# Altium PCB Side_PCB_v1.0.PcbDoc
Units mil, origin at the board's own origin, x right, y up, seen from the top; angles counter-clockwise.
Board outline 1614.17 x 295.28 mil, 2 copper layers (Top Layer, Bottom Layer), stack 33.378 mil thick; 5 components, 6 nets, 22 pads, 4 vias.
Unrouted connection lines stored in the file: 4.
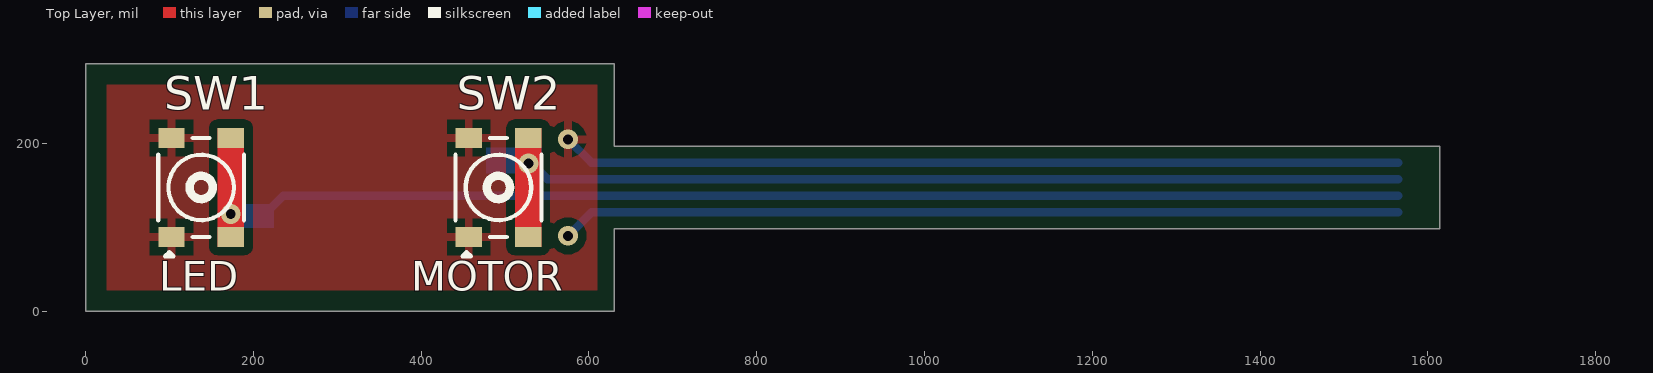
[diagram p0: Top Layer view]
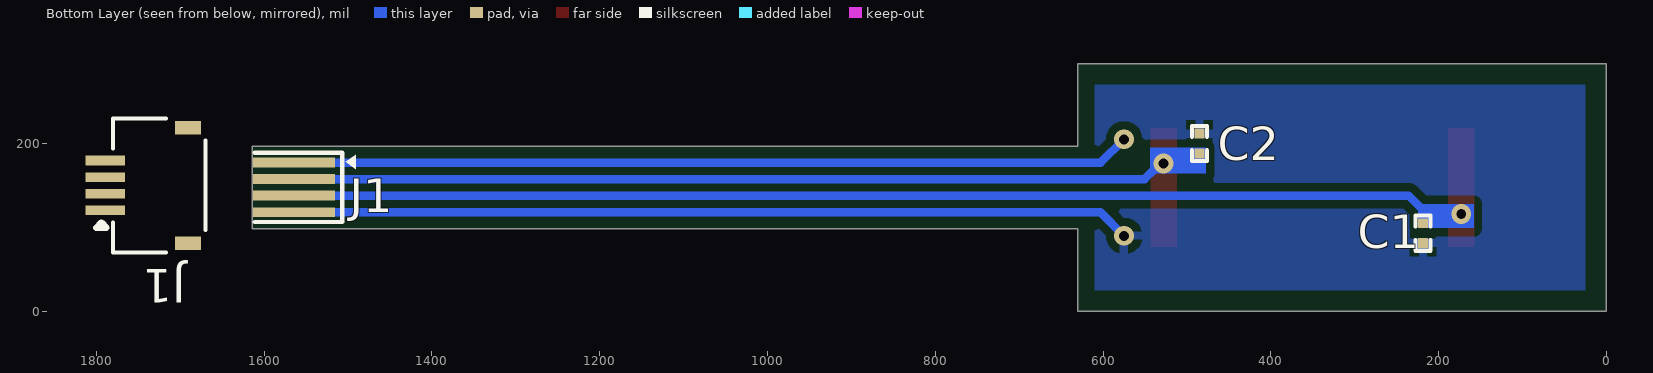
[diagram p1: Bottom Layer view, seen from below]

## Layer stack, top to bottom
Top Solder: solder mask 3, Solder Resist, Dk 3.5
Top Layer: signal copper 10
Dielectric 1: dielectric 13.378, FR-4, Dk 4.8
Bottom Layer: signal copper 10
Bottom Solder: solder mask 3, Solder Resist, Dk 3.5

## Board outline
0,0 629.92,0 629.92,98.43 1614.17,98.43 1614.17,196.85 629.92,196.85 629.92,295.28 0,295.28
board region "Layer Stack Region 1": 629.92,196.85 1614.17,196.85 1614.17,98.42 629.92,98.42
board region "Layer Stack Region 1": 629.92,78.74 629.92,0 0,0 0,295.28 629.92,295.28 629.92,216.54

## Design rules (kind name [scope] priority, off if disabled: settings)
Clearance [All] p1: gap=10 ignorepadtopadclearanceinfootprint=FALSE except(0: Arc-Hole Track-Hole SMDPad-Hole THPad-Hole Via-Hole Fill-Hole Poly-Hole Region-Hole Text-Hole; 3: SMDPad-SMDPad; 5: Arc-Arc Arc-Track Arc-SMDPad Track-Track Track-SMDPad SMDPad-Fill SMDPad-Poly SMDPad-Region)
MinimumSolderMaskSliver [All] p1: minsoldermaskwidth=0
PolygonConnect [All] p1: connectstyle=Relief reliefconductorwidth=10 reliefentries=4 polygonreliefangle="90 Angle" airgapwidth=10
RoutingVias [All] p1: holewidth=11.81 width=23.62 viastyle="Through Hole" minholewidth=11.81 minwidth=23.62 maxholewidth=11.81 maxwidth=23.62
SilkToSilkClearance [All] p1: silktosilkclearance=0
SilkToSolderMaskClearance [IsPad] p1: minsilkscreentomaskgap=0 clearancetoexposedcopper=TRUE
SolderMaskExpansion [All] p1: expansion=4 istentingtop=FALSE
Width [All] p1: maxlimit=10 minlimit=10 preferedwidth=10
27 further rules are at their usual default settings.

## Components (designator, comment, footprint, x,y, rotation, side; value= is the part's Value field where it differs from the comment)
C1 "100nF" CAP-0201 218.63,93.16 r90 bottom locked
C2 "100nF" CAP-0201 485,200 r270 bottom
J1 "FH19C-4S-0.5SH(10)" FH19C-4S-0.5SH(10) 1740,150 r90 bottom
SW1 "GT-TC025D-H0065-L1" GT-TC025D-H0065-L1. 137.8,147.64 r90 top locked
SW2 "GT-TC025D-H0065-L1" GT-TC025D-H0065-L1. 492.13,147.64 r90 top locked

## Footprints (in the part's own frame and the unit in brackets; to place one, negate y for a bottom-side part, rotate by r counter-clockwise, add the part's x,y. Pads: shape width x height; smd on the part's side, far side on the other; paste and mask are expansions set on the pad)
CAP-0201 [mm]
  rect 0.3x0.3 smd mask+0.055: 1(-0.3,0) 2(0.3,0)
  silkscreen extent -0.53,-0.23 0.53,0.23, body extent -0.3,-0.15 0.3,0.15, height 0.28
FH19C-4S-0.5SH(10) [mm]
  rect 0.3x1.2 smd: 1(-0.75,1.25) 2(-0.25,1.25) 3(0.25,1.25) 4(0.75,1.25)
  rect 0.4x0.8 smd: MP1(-1.75,-1.25) MP2(1.75,-1.25)
  silkscreen extent -2.03,-1.78 2.03,1.52, body extent -2,-2.03 2,1.47, height 0.9
GT-TC025D-H0065-L1. [mm]
  rect 0.6x0.8 smd: 1(-1.5,0.9) 2(1.5,0.9) 3(1.5,-0.9) 4(-1.5,-0.9)
  silkscreen extent -2.08,-1.3 1.5,1.3, body extent -1.7,-1.3 1.7,1.3, height 0.6

## Part data
C1 C2: library part CC0201KRX5R6BB104, "CAP CER 0.1UF 10V X5R 0201", Case Code (Imperial)=0201, Case Code (Metric)=0603, Dielectric=X5R, LCSC Part Number=C190183, Manufacturer=Yageo, Max Operating Temperature=85°C, Min Operating Temperature=-55°C, Resistor Type=Ceramic, Supplier Part Number 1=603-CC201KRX5R6BB104, Tolerance=10%, Voltage Rating=10V, Capacitance=100nF, Case/Package=0201, Category="Ceramic Capacitors", ComponentLink1Description=https://datasheet.ciiva.com/11587/upy-gphc-x5r-4v-to-50v-12-11587190.pdf?src-supplier=Avnet, ComponentLink1URL=https://datasheet.ciiva.com/11587/upy-gphc-x5r-4v-to-50v-12-11587190.pdf?src-supplier=Avnet, Construction=Flat, Depth=0.3mm, Halogen Free="Halogen Free", Height=0.3mm, Lead Free="Lead Free", Length=0.6mm, Manufacturer Part Number=CC0201KRX5R6BB104, Mount="Surface Mount", Packaging="Tape and Reel", Pricing 1="1=0.10000, 10=0.02400, 50=0.02400, 100=0.01900, 1000=0.01100, 10000=0.00900 (USD)", Radiation Hardening=No, RoHS=Yes, RoHS Compliant=Yes, Series=CC, Stock 1=824403, Supplier 1=Mouser, Termination=SMD/SMT, Thickness=0.013inch, Voltage Rating (DC)=10V, Weight=6E-06oz, Width=0.012inch
J1: "CONN FFC BOTTOM 4POS 0.5MM R/A", Current Rating=500mA, Flammability Rating="UL94 V-0", Insulation Resistance=500MR, LCSC Part Number=C424650, Manufacturer=Hirose, Max Operating Temperature=85°C, Min Operating Temperature=-55°C, Package Quantity=5000, Supplier Part Number 1=H125822CT-ND, Voltage Rating=50V, Actuator Material="Polymer,Polyphenylene,Liquid Crystal Polymer", Category="FFC / FPC", ComponentLink1Description=https://datasheet.ciiva.com/18563/ed-fh19cfh19sc-20140305-18563548.pdf?src-supplier=Digi-Key, ComponentLink1URL=https://datasheet.ciiva.com/18563/ed-fh19cfh19sc-20140305-18563548.pdf?src-supplier=Digi-Key, Contact Material=Bronze, Contact Plating=Gold, Housing Material=Polymer, Item Type="FPC Connector", Manufacturer Part Number=FH19C-4S-0.5SH(10), Mounting Technology="Surface Mount", Number of Positions=4, Packaging="Tape and Reel", Pitch=0.02inch, Pricing 1="1=1.08, 10=0.916, 25=0.878, 50=0.8596, 100=0.8221, 250=0.7474, 500=0.67266, 1000=0.59792, 2500=0.54186 (USD)", RoHS=Yes, RoHS Compliant=Yes, Series=FH19C, Stock 1=7956, Supplier 1=Digi-Key, Termination=Solder, Wire/Cable Type="Flat Flex"
SW1 SW2: "No NO J pin 50mA 3mm 100MΩ 100000 12V 250gf@±30gf 2.6mm -30℃~+85℃ 0.65mm Black Round Button Brick nogging SPST SMD Tactile Switches ROHS", LCSC Part Number=C778132, Manufacturer=G-Switch, ComponentLink1Description=LCSC, ComponentLink1URL=https://www.lcsc.com/product-detail/Tactile-Switches_G-Switch-GT-TC025D-H0065-L1_C778132.html, Item Type="Tactile Switch", Manufacturer Part Number=GT-TC025D-H0065-L1

## Free pads (board coordinates)
  rect 98.43x11.81 smd far side mask+0: 1(1564.73,177.17) 2(1564.73,157.48) 3(1564.73,137.8) 4(1564.73,118.11)

## Via types
v1: diameter 23.62, hole 11.81, Top Layer to Bottom Layer, 4 vias

## Nets (pads, with @x,y where several pads share a name; then routed paths per layer and width w, separated by ;. In a path a pad name is that pad's centre, name@x,y a point inside that pad or via, vN(x,y) a via of type N, cw(c..) or ccw(c..) an arc to the next point about the centre after c; other vN are vias at no path point)
GND: C1.1 C2.1 J1.4 pad.4 | length 1001.4
  Bottom Layer w10: v1(575,90) 603.11,118.11 pad.4
LED: C1.2 J1.3 pad.3 SW1.3 SW1.4 | length 1355.5
  Bottom Layer w10: 217,119 235.8,137.8 pad.3
  other v1: 173,116
MOTOR: C2.2 J1.2 pad.2 SW2.3 SW2.4 | length 1030.6
  Bottom Layer w10: 538.94,168.97 550.43,157.48 608.24,157.48 pad.2
  other v1: 528,176
NetLED1_1: 
OUT: 
VBAT: J1.1 pad.1 SW1.1 SW1.2 SW2.1 SW2.2 | length 1001.3
  Bottom Layer w10: v1(575,205) 602.83,177.17 pad.1
pads on no net: J1.MP1 J1.MP2

## Polygon pours and split planes (outlines as drawn)
GND on Bottom Layer "GND_L02_P002" (solid, pour order 2): 25,270 25,25 609.87,25 609.87,270
VBAT on Top Layer "VBAT_L01_P001" (solid, pour order 1): 25,270 25,25 610,25 610,270

## Other copper
Top Layer:
  rectangle net LED: 157.48,76.77 188.98,218.5
  rectangle net MOTOR: 511.81,76.77 543.31,218.5
Bottom Layer:
  rectangle net MOTOR: 477,164 543.91,195
  rectangle net LED: 158,99.06 224.54,128

## Silkscreen, mask and mechanical layers (free items; w line width, h text height)
Top Overlay:
  text "LED" at 87.99,12.65 h60
  text "MOTOR" at 388.13,12.7 h60
Bottom Overlay:
  region: 1491,169.5 1502.5,178.5 1491,186.5
  lines w5: 1611.17,106.3 1507,106.3 1507,188.98 1611.17,188.98
  text "J1" at 1497.66,118.01 h40
Board Outline:
  lines w0.5: 1521.15,196.85 1527.47,196.85 ; 0,0 629.92,0 ; 0,0 0,0 ; 0,0 0,295.28 629.92,295.28 629.92,196.85 ; 629.92,0 629.92,0 ; 629.92,0 629.92,98.43 1614.17,98.43 1614.17,196.85 629.92,196.85 ; 629.92,0 629.92,0 ; 629.92,196.85 629.92,196.85 ; 314.96,0 314.96,0
Fabrication:
  drawing of 191 lines, arcs and shapes, not listed
  text "Layer" at -1502.91,1687.99 h60
  text "Name" at -1093,1687.99 h60
  text "Material" at -163.26,1687.99 h60
  text "Thickness" at 696.51,1687.99 h60
  text "Constant" at 1346.35,1687.99 h60
  text "Board Layer Stack" at 1916.21,1687.99 h60
  text "Top Overlay" at -1093,1567.99 h60
  text "Top Solder" at -1093,1447.99 h60
  text "Solder Resist" at -163.26,1447.99 h60
  text "0.076mm" at 696.51,1447.99 h60
  text "3.5" at 1346.35,1447.99 h60
  text "1" at -1502.91,1327.99 h60
  text "Top Layer" at -1093,1327.99 h60
  text "0.254mm" at 696.51,1327.99 h60
  text "Dielectric 1" at -1093,1207.99 h60
  text "FR-4" at -163.26,1207.99 h60
  text "0.340mm" at 696.51,1207.99 h60
  text "4.8" at 1346.35,1207.99 h60
  text "2" at -1502.91,1087.99 h60
  text "Bottom Layer" at -1093,1087.99 h60
  text "0.254mm" at 696.51,1087.99 h60
  text "Bottom Solder" at -1093,967.99 h60
  text "Solder Resist" at -163.26,967.99 h60
  text "0.076mm" at 696.51,967.99 h60
  text "3.5" at 1346.35,967.99 h60
  text "Bottom Overlay" at -1093,847.99 h60
  text "Total board thickness:" at -1502.91,727.99 h60
  text "1.000mm" at 696.51,727.99 h60
  text "Stiffener Area" at 1165,-187 h60
  text "Material : Polyimide" at 980,-267.01 h60
Drill Drawing:
  lines w10: -1514.71,2113.5 -1448.04,2113.5 -1448.04,2180.17 -1514.71,2180.17 -1514.71,2113.5
  lines w15: -1574.5,2068.5 5295.65,2068.5 ; -1574.5,2218.5 5295.65,2218.5 ; -1023.62,1918.5 -1023.62,2368.5 ; -543.74,1918.5 -543.74,2368.5 ; 525.95,1918.5 525.95,2368.5 ; 1031.82,1918.5 1031.82,2368.5 ; 1765.62,1918.5 1765.62,2368.5 ; 3265.17,1918.5 3265.17,2368.5 ; 3855.02,1918.5 3855.02,2368.5 ; 4600.82,1918.5 4600.82,2368.5 ; -1574.5,1918.5 5295.65,1918.5 5295.65,2368.5 -1574.5,2368.5 -1574.5,1918.5
  text "Symbol" at -1484.5,2263.5 h72
  text "Count" at -978.62,2263.5 h72
  text "Hole Size" at -498.74,2263.5 h72
  text "Plated" at 570.95,2263.5 h72
  text "Hole Type" at 1076.82,2263.5 h72
  text "Drill Layer Pair" at 1810.62,2263.5 h72
  text "Via/Pad" at 3310.17,2263.5 h72
  text "Pad Shape" at 3900.02,2263.5 h72
  text "Template" at 4645.82,2263.5 h72
  text "4" at -978.62,2113.5 h60
  text "11.81mil (0.300mm)" at -498.74,2113.5 h60
  text "PTH" at 570.95,2113.5 h60
  text "Round" at 1076.82,2113.5 h60
  text "Top Layer - Bottom Layer" at 1810.62,2113.5 h60
  text "Via" at 3310.17,2113.5 h60
  text "Rounded" at 3900.02,2113.5 h60
  text "v60h30" at 4645.82,2113.5 h60
  text "4 Total" at -978.62,1963.5 h60

## Dimensions
0,295.28 to 0,0 on Dimensions
0,0 to 629.92,0 on Dimensions
629.92,196.85 to 1614.17,196.85 on Dimensions
1614.17,98.43 to 1476.38,98.43 on Fabrication